# Altium PCB IoT_1062.PcbDoc (part 1 of 3)
Units mm, origin at the board's own origin, x right, y up, seen from the top; angles counter-clockwise.
Board outline 174.13 x 100.2 mm, 2 copper layers (Top Layer, Bottom Layer); 191 components, 138 nets, 1095 pads, 196 vias.
Unrouted connection lines stored in the file: 289.
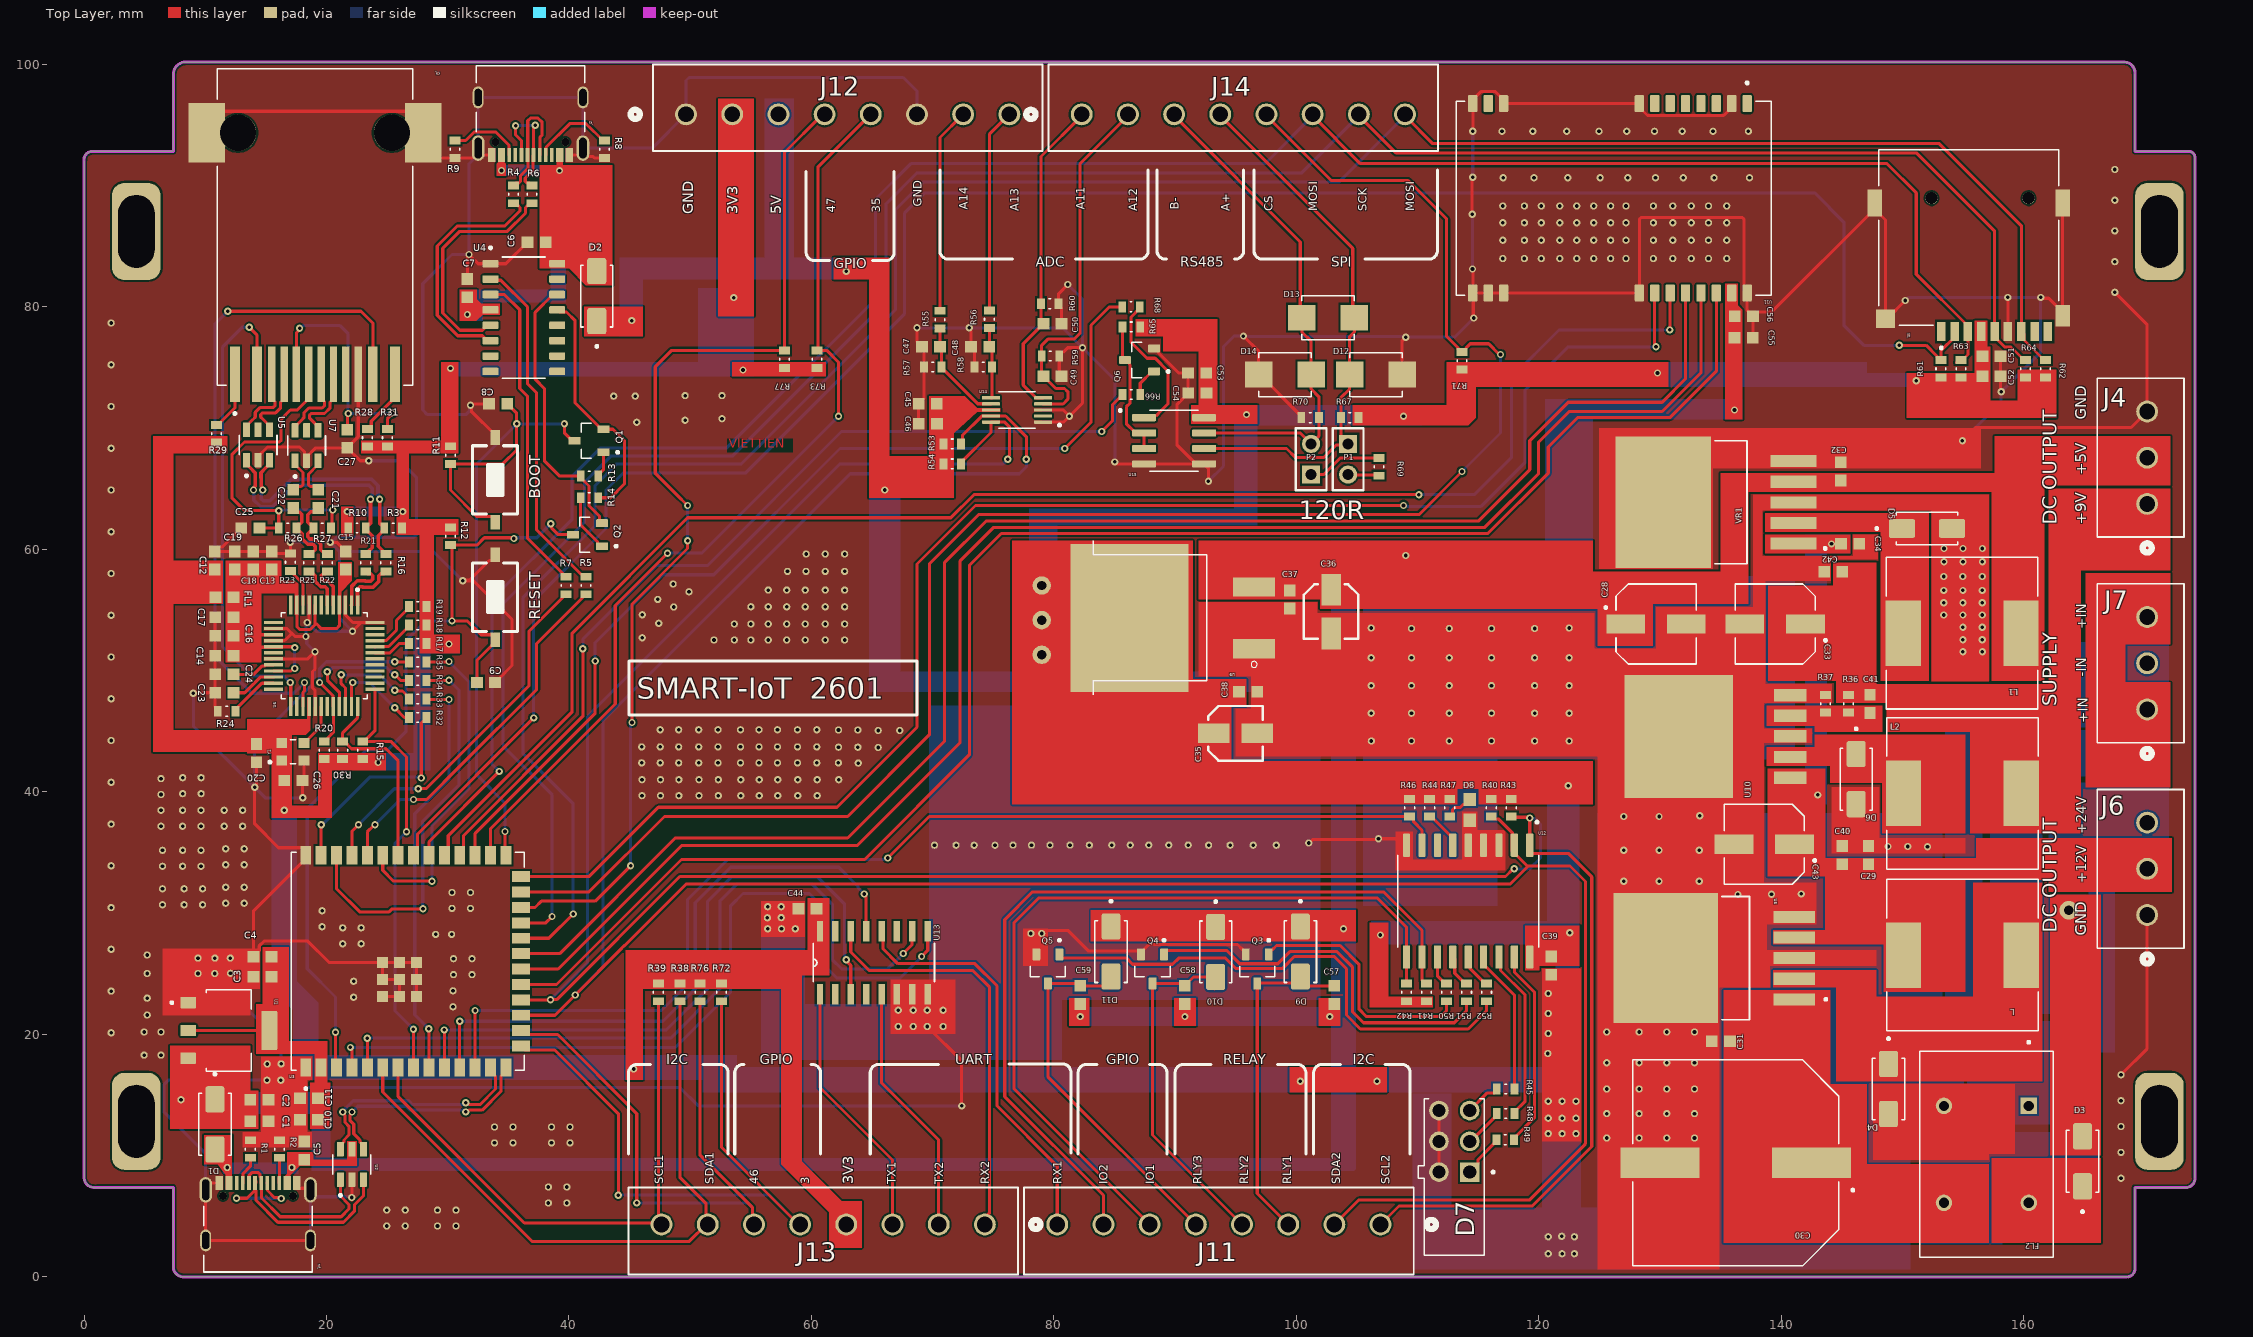
[diagram p0: Top Layer view]
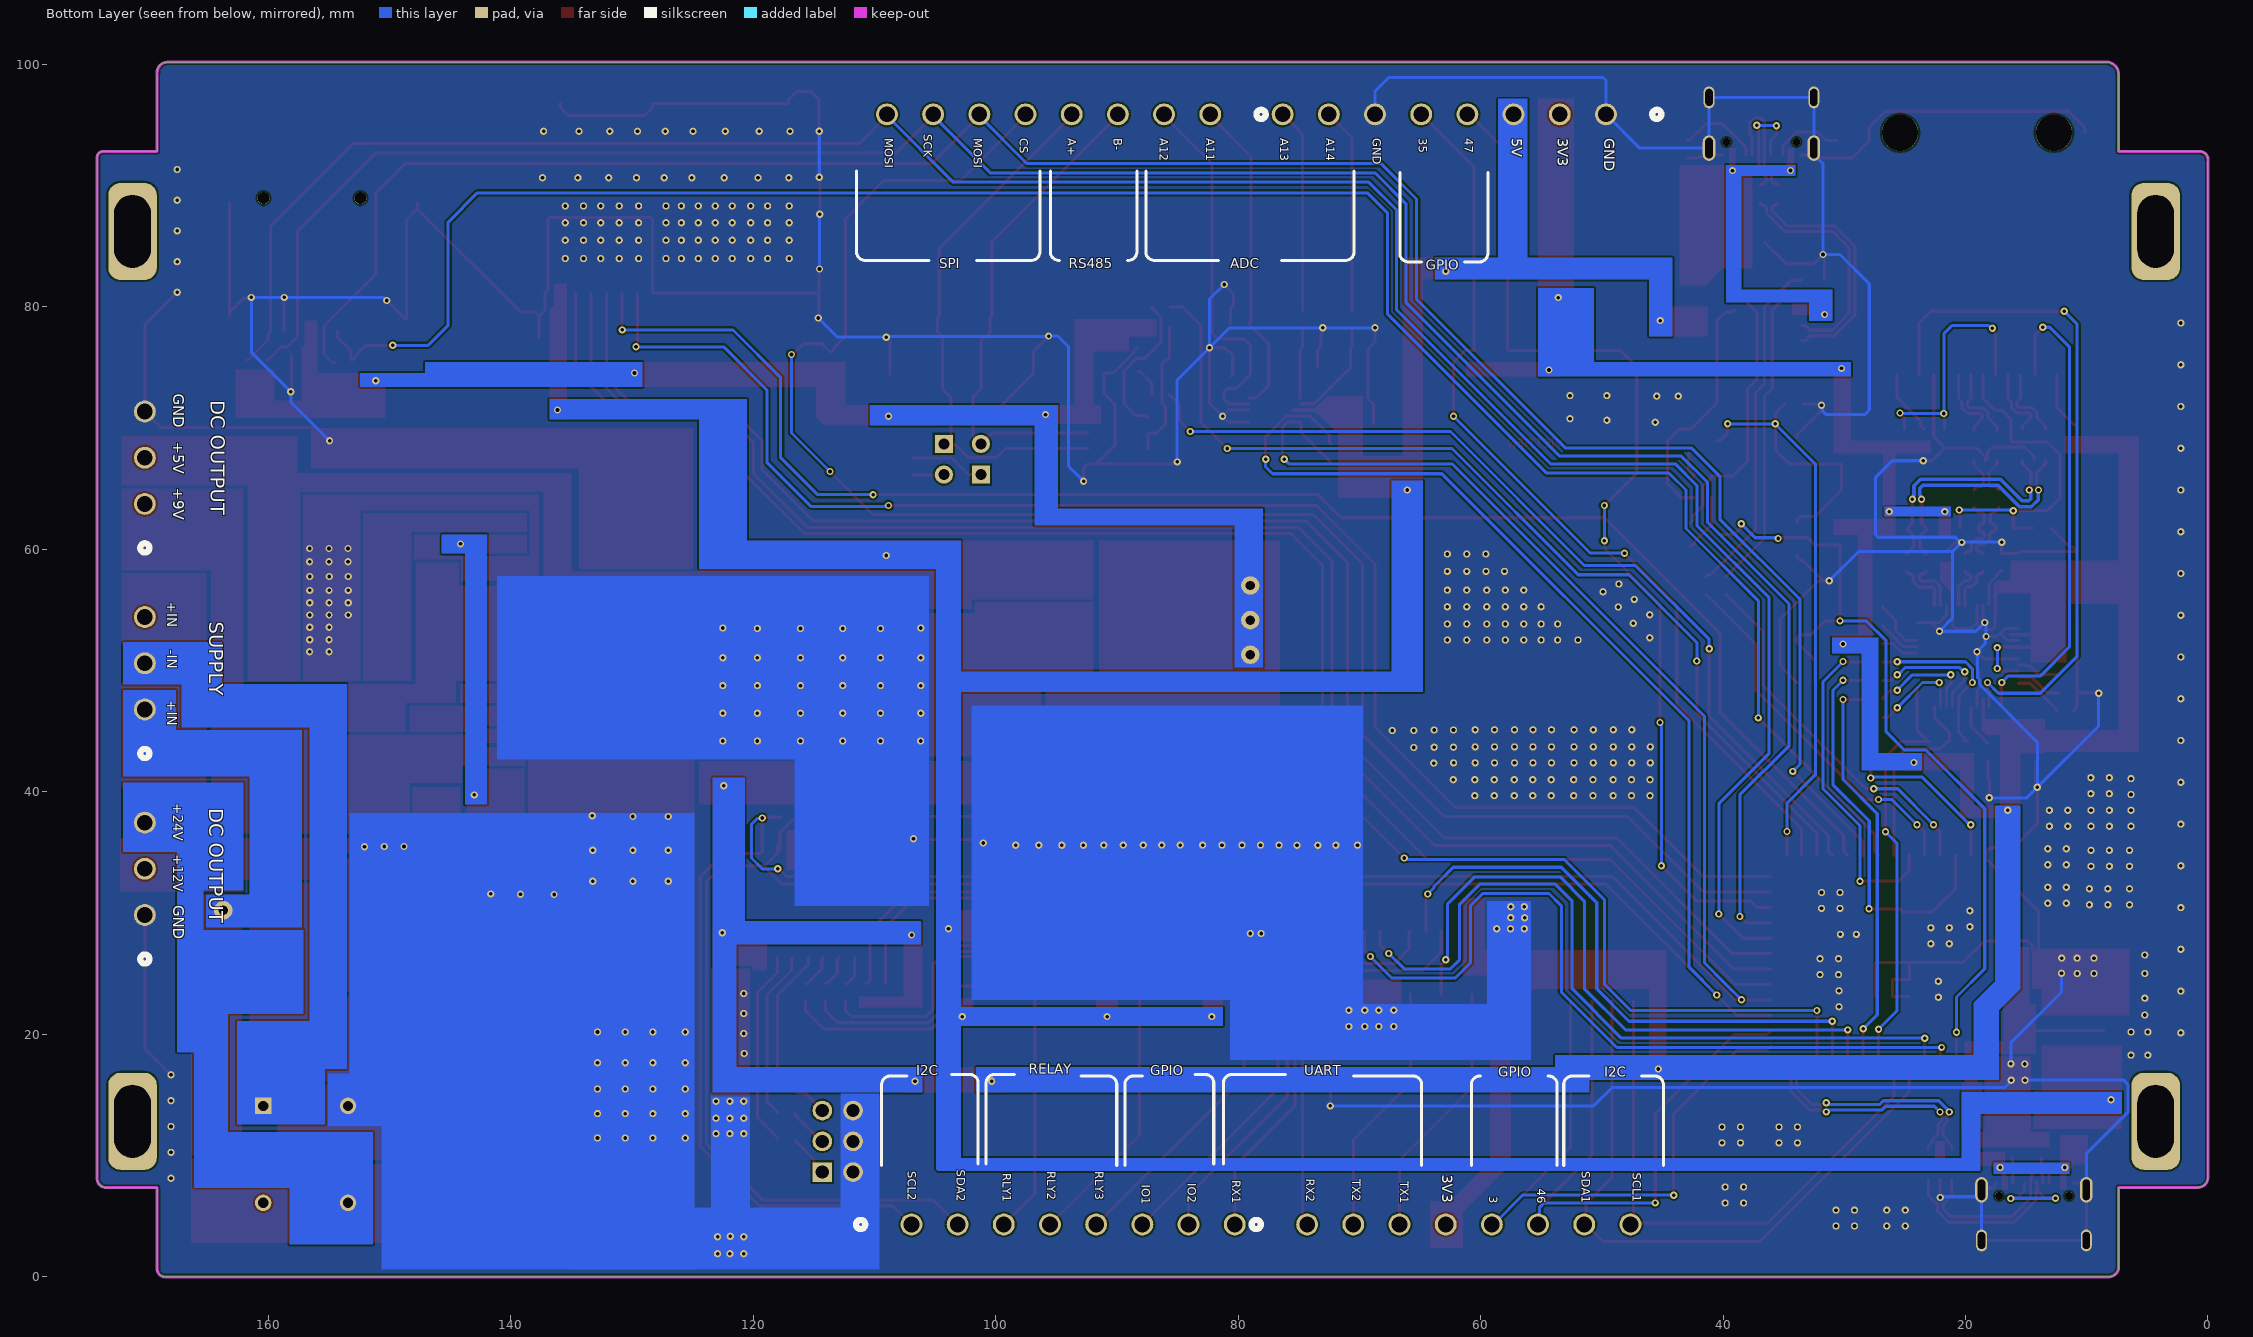
[diagram p1: Bottom Layer view, seen from below]
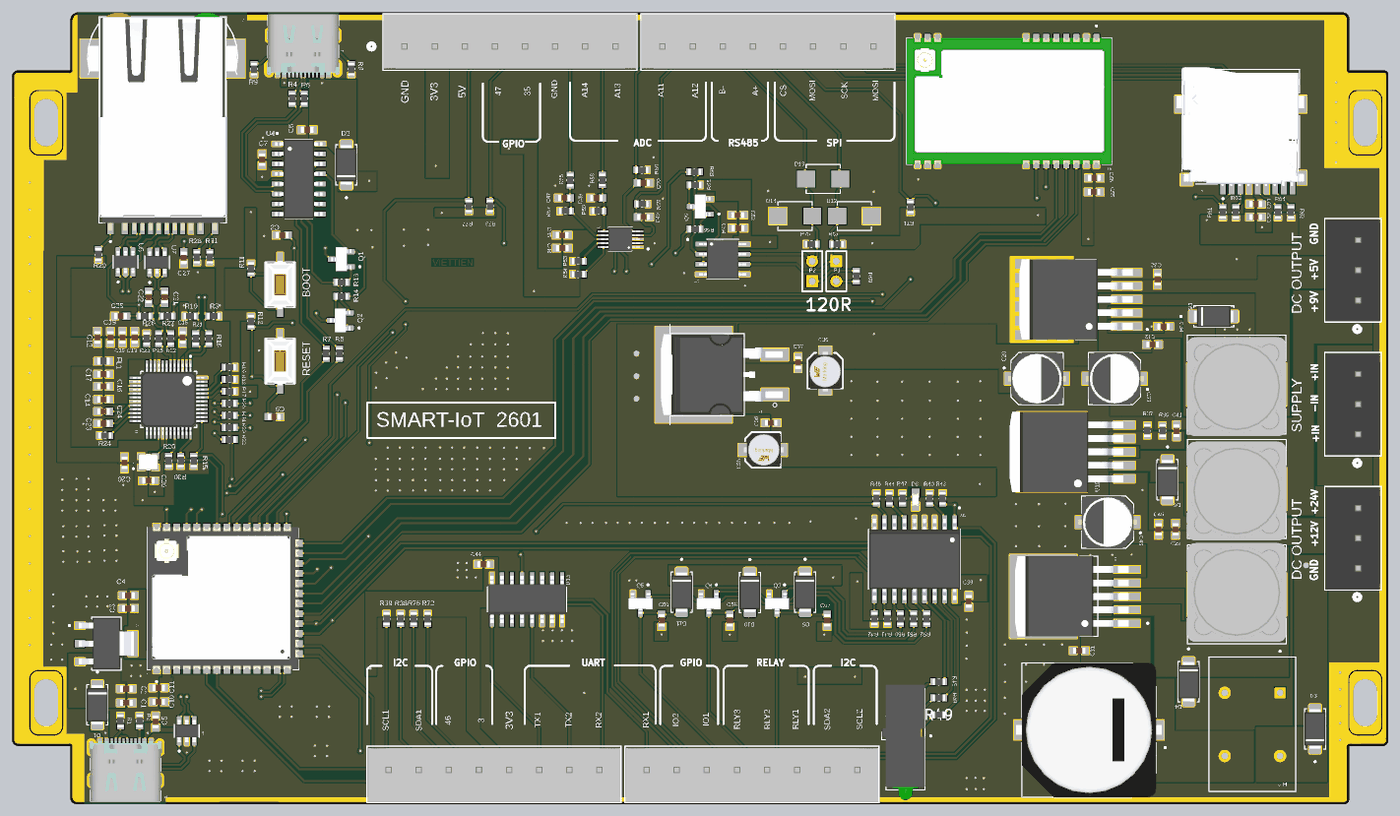
[diagram p4: 3D render of the assembled board from above, using the file's embedded part models]

## Layer stack, top to bottom
Top Solder: solder mask 0.0102, Solder Resist, Dk 3.5
Top Layer: signal copper 0.0356
Dielectric 1: dielectric 0.32, FR-4, Dk 4.8
Bottom Layer: signal copper 0.0356
Bottom Solder: solder mask 0.0102, Solder Resist, Dk 3.5

## Board outline
7.366,0.889 7.366,7.366 0.889,7.366 cw(c0.825,8.191) 0,8.128 0,92.075 cw(c0.699,92.138) 0.635,92.837 7.366,92.837 7.366,99.187 cw(c8.381,99.188) 8.38,100.203 168.367,100.203 cw(c168.284,99.314) 169.173,99.23 169.173,92.846 173.609,92.837 cw(c173.609,92.329) 174.117,92.329 174.117,8.255 cw(c173.355,8.128) 173.482,7.366 169.164,7.366 169.164,0.635 cw(c168.529,0.635) 168.529,0 8.128,0 cw(c8.191,0.825)

## Design rules (kind name [scope] priority, off if disabled: settings)
Clearance [All] p1: gap=0.15 ignorepadtopadclearanceinfootprint=FALSE
DiffPairsRouting [All] p1: maxlimit=0.5 minlimit=0.15 mostfreqgap=0.2 toplayer_minwidth=0.15 toplayer_maxwidth=0.387 toplayer_prefwidth=0.387 bottomlayer_minwidth=0.15 bottomlayer_maxwidth=0.387 bottomlayer_prefwidth=0.387 impedanceprofiledriven=TRUE impedanceprofileid={02A447C3-7AF3-4D12-9408-80F1CC7F62F1} impedanceprofilevalue=90.000000 maxuncoupledlength=12.7
HoleSize [All] p1: absolutevalues=TRUE maxlimit=10 minlimit=0.025 maxpercent=80.000 minpercent=20.000
MinimumSolderMaskSliver [All] p1: minsoldermaskwidth=0.002
PlaneConnect [All] p1: planeconnectstyle=Direct reliefexpansion=0.508 reliefentries=4 reliefconductorwidth=0.254 reliefairgap=0.254
PolygonConnect [All] p1: connectstyle=Direct reliefconductorwidth=0.254 reliefentries=4 polygonreliefangle="90 Angle" airgapwidth=0.254
RoutingVias [All] p1: holewidth=0.3 width=0.6 viastyle="Through Hole" minholewidth=0.3 minwidth=0.6 maxholewidth=2 maxwidth=3
SilkToSilkClearance [All] p1: silktosilkclearance=0.002
SilkToSolderMaskClearance [IsPad] p1: minsilkscreentomaskgap=0.002 clearancetoexposedcopper=TRUE
SolderMaskExpansion [All] p1: expansion=0.102 istentingtop=FALSE
Width [All] p1: maxlimit=0.254 minlimit=0.254 preferedwidth=0.254
24 further rules are at their usual default settings.

## Classes and differential pairs
component class Nguon: C28 C29 C30 C31 C32 C33 C34 C35 C36 C37 C38 C40 C41 C42 C43 D3 D4 D5 D6 FL2 J4 J6 J7 L L1 L2 R36 R37 U8 U9 U10 VR1
component class connection: C12 C13 C14 C15 C16 C17 C18 C19 C20 C21 C22 C23 C24 C25 C26 C27 C39 C44 C45 C46 C47 C48 C49 C50 C51 C52 C53 C54 C55 C56 C57 C58 C59 D7 D8 D9 D10 D11 D12 D13 D14 FL1 J3 J8 J11 J12 J13 J14 P1 P2 Q3 Q4 Q5 Q6 R3 R10 R15 R16 R17 R18 R19 R20 R21 R22 R23 R24 R25 R26 R27 R28 R29 R30 R31 R32 R33 R34 R35 R40 R41 R42 R43 R44 R45 R46 R47 R48 R49 R50 R51 R52 R53 R54 R55 R56 R57 R58 R59 R60 R61 R62 R63 R64 R65 R66 R67 R68 R69 R70 R71 R72 R73 R76 R77 U5 U6 U7 U11 U12 U13 U14 U15 Y1
component class vi_dieu_khien: BOOT C1 C2 C3 C4 C5 C6 C7 C8 C9 C10 C11 D1 D2 J1 J2 Q1 Q2 R1 R2 R4 R5 R6 R7 R8 R9 R11 R12 R13 R14 R38 R39 RESET U1 U2 U3 U4
differential pair W_TX: +W_TX_P -W_TX_N
differential pair W_RX: +W_RX_P -W_RX_N
differential pair TX: +TX_P -TX_N
differential pair RX: +RX_P -RX_N
differential pair RJ_TX: +RJ_TX_P -RJ_TX_N
differential pair RJ_RX: +RJ_RX_P -RJ_RX_N
differential pair ETH_RX: +ETH_RX_P -ETH_RX_N
differential pair USB: +USB_P -USB_N
differential pair USB1: +USB1_P -USB1_N
differential pair UD: +UD_P -UD_N
differential pair D: +D_P -D_N

## Components (designator, comment, footprint, x,y, rotation, side; value= is the part's Value field where it differs from the comment)
BOOT "Nut Nhan 2 Chan SMD 3x6x2.5" PCBComponent_1 35.687,61.666 r90 top
C1 "4.7uF" CAPC1608X94N 14.466,12.827 r180 top
C2 "0.1uF" CAPC1608X94N 14.466,14.605 r180 top
C3 "0.1uF" CAPC1608X94N 14.72,24.765 r0 top
C4 "4.7uF" CAPC1608X94N 14.72,26.416 r0 top
C5 "0.1uF" CAPC1608X94N 18.161,10.414 r270 top
C6 "0.1uF" CAPC1608X94N 37.338,85.344 r0 top
C7 "0.1uF" CAPC1608X94N 31.623,81.546 r270 top
C8 "0.1uF" CAPC1608X94N 34.163,72.009 r180 top
C9 "0.1uF" CAPC1608X94N 33.159,49.022 r0 top
C10 "0.1uF" CAPC1608X94N 18.554,12.954 r0 top
C11 "4.7uF" CAPC1608X94N 18.554,14.732 r0 top
C12 "100nF" CAPC1608X94N 10.795,59.084 r90 top
C13 "4.7uF" CAPC1608X94N 15.494,59.084 r90 top
C14 "100nF" CAPC1608X94N 11.569,51.222 r180 top
C15 "100nF" CAPC1608X94N 21.59,59.084 r90 top
C16 "100nF" CAPC1608X94N 11.569,52.873 r180 top
C17 "100nF" CAPC1608X94N 11.569,54.397 r180 top
C18 "100nF" CAPC1608X94N 13.97,59.084 r90 top
C19 "100nF" CAPC1608X94N 12.446,59.084 r90 top
C20 "100nF" CAPC1608X94N 14.224,43.198 r270 top
C21 "6.8nF" CAPC1608X94N 19.304,64.164 r90 top
C22 "6.8nF" CAPC1608X94N 17.272,64.164 r90 top
C23 "10nF" CAPC1608X94N 11.569,48.174 r180 top
C24 "4.7uF" CAPC1608X94N 11.569,49.698 r180 top
C25 "10nF" CAPC1608X94N 13.728,61.763 r0 top
C26 "100nF" CAPC1608X94N 17.26,40.935 r0 top
C27 "22nF" CAPC1608X94N 21.717,69.129 r90 top
C28 "100uF/35V" CAP_EEEFTE221XAL 129.667,53.848 r0 top
C29 "0.1uF" CAPC1608X94N 147.193,34.786 r270 top
C30 "1000uF/50V" CAP_EEVFK1H102M 136.244,9.398 r180 top
C31 "0.1uF" CAPC1608X94N 135.013,19.431 r0 top
C32 "0.1uF" CAPC1608X94N 144.907,66.433 r270 top
C33 "100uF/35V" CAP_EEEFTE221XAL 139.486,53.848 r180 top
C34 "0.1uF" CAPC1608X94N 145.681,60.452 r180 top
C35 "10uF/16V" WCAP-ASNP_4X5.5(DXL) 94.974,44.831 r180 top
C36 "10uF/16V" WCAP-AS5H_4X5.5(DXL) 102.87,54.864 r90 top
C37 "0.1uF" CAPC1608X94N 99.441,55.868 r90 top
C38 "0.1uF" CAPC1608X94N 96.024,48.26 r180 top
C39 "0.1uF" CAPC1608X94N 121.031,25.666 r90 top
C40 "0.1uF" CAPC1608X94N 145.034,34.786 r270 top
C41 "82pF" CAPC1608X94N 147.32,47.256 r90 top
C42 "0.1uF" CAPC1608X94N 144.284,58.166 r0 top
C43 "100uF/35V" CAP_EEEFTE221XAL 138.597,35.687 r180 top
C44 "0.1uF" CAPC1608X94N 59.678,30.353 r0 top
C45 "10uF" CAPC1608X94N 69.596,72.009 r0 top
C46 "0.1uF" CAPC1608X94N 69.608,70.358 r0 top
C47 "10uF" CAPC1608X94N 69.862,76.708 r0 top
C48 "10uF" CAPC1608X94N 73.914,76.708 r0 top
C49 "10uF" CAPC1608X94N 79.883,74.295 r180 top
C50 "10uF" CAPC1608X94N 79.883,78.613 r180 top
C51 "10uF" CAPC1608X94N 157.341,75.946 r180 top
C52 "100nF" CAPC1608X94N 157.341,74.295 r180 top
C53 "0.1uF" CAPC1608X94N 91.821,74.549 r0 top
C54 "10uF" CAPC1608X94N 91.833,72.898 r0 top
C55 "0.1uF" CAPC1608X94N 136.894,77.47 r180 top
C56 "4.7uF" CAPC1608X94N 136.918,79.248 r180 top
C57 "0.1uF" CAPC1608X94N 103.124,23.253 r270 top
C58 "0.1uF" CAPC1608X94N 90.805,23.253 r270 top
C59 "0.1uF" CAPC1608X94N 82.169,23.253 r270 top
D1 "B340A-E3/61T" DIOM5126X229N 10.795,12.573 r270 top
D2 "B340A-E3/61T" DIOM5126X229N 42.291,80.899 r90 top
D3 "B340A-E3/61T" DIOM5126X229N 164.846,9.525 r90 top
D4 "B340A-E3/61T" DIOM5126X229N 148.844,15.494 r270 top
D5 "B340A-E3/61T" DIOM5126X229N 152.019,61.722 r0 top
D6 "B340A-E3/61T" DIOM5126X229N 146.177,41.054 r270 top
D7 "5700100132F" LED_5700100132F 113.03,8.636 r90 top
D8 "LTST-C191KSKT" 0603 114.3,38.52 r90 top
D9 "B340A-E3/61T" DIOM5126X229N 100.33,26.83 r270 top
D10 "B340A-E3/61T" DIOM5126X229N 93.345,26.797 r270 top
D11 "B340A-E3/61T" DIOM5126X229N 84.709,26.83 r270 top
D12 "SMBJ12CA" DIOM4336X265N 106.559,74.422 r0 top
D13 "SMBJ12CA" DIOM4336X265N 102.616,79.121 r0 top
D14 "SMBJ12CA" DIOM4336X265N 99.054,74.422 r0 top
FL1 "120R" BEADC1608X95N 11.584,56.048 r0 top
FL2 "FIL_SU9V-07010" FIL_SU9V-07010 156.916,10.097 r270 top
J1 "TypeC_12pin_12402012E212A" TypeC_12pin_12402012E212A 14.355,2.997 r0 top
J2 "TypeC_12pin_12402012E212A" TypeC_12pin_12402012E212A 36.83,97.282 r180 top
J3 "Ethernet_HR961160C" HANRUN_HR961160C 19.05,86.591 r0 top
J4 "395111003" CONN_SD-39511-001_03P_MOL 170.18,63.754 r90 top
J6 "395111003" CONN_SD-39511-001_03P_MOL 170.18,29.845 r90 top
J7 "395111003" CONN_SD-39511-001_03P_MOL 170.18,46.799 r90 top
J8 "MSD-1-A" CUI_MSD-1-A 155.448,85.725 r180 top
J11 "395111008" terminal_block_8_male 106.947,4.318 r180 top
J12 "395111008" terminal_block_8_male 49.657,95.885 r0 top
J13 "395111008" terminal_block_8_male 74.308,4.318 r180 top
J14 "395111008" terminal_block_8_male 82.296,95.885 r0 top
L "47uH" Introdutor_47uH_12x12x7 154.94,26.543 r0 top
L1 "47uH" Introdutor_47uH_12x12x7 154.916,53.086 r180 top
L2 "47uH" Introdutor_47uH_12x12x7 154.94,39.878 r180 top
P1 "Header 2" HDR1X2 104.267,68.707 r270 top
P2 "Header 2" HDR1X2 101.219,66.167 r90 top
Q1 "MMBT3904" TRANS_MMBT3904 41.656,68.961 r180 top
Q2 "MMBT3904" TRANS_MMBT3904 41.529,61.214 r180 top
Q3 "MMBT3904" TRANS_MMBT3904 96.774,25.4 r270 top
Q4 "MMBT3904" TRANS_MMBT3904 88.138,25.4 r270 top
Q5 "MMBT3904" TRANS_MMBT3904 79.502,25.4 r270 top
Q6 "MMBT3904" TRANS_MMBT3904 87.065,75.626 r180 top
R1 "5K1" RES_ERJU03J474V 13.716,10.541 r270 top
R2 "5K1" RES_ERJU03J474V 16.129,10.541 r270 top
R3 "49R9" RES_ERJU03J474V 25.49,61.763 r0 top
R4 "22R" RES_ERJU03J474V 35.433,89.281 r270 top
R5 "22R" RES_ERJU03J474V 41.402,57.023 r270 top
R6 "22R" RES_ERJU03J474V 36.957,89.281 r270 top
R7 "22R" RES_ERJU03J474V 39.751,57.023 r270 top
R8 "5K1" RES_ERJU03J474V 42.926,93.009 r90 top
R9 "5K1" RES_ERJU03J474V 30.607,93.009 r90 top
R10 "49R9" RES_ERJU03J474V 22.516,61.763 r180 top
R11 "10k" RES_ERJU03J474V 30.226,67.781 r270 top
R12 "10k" RES_ERJU03J474V 30.226,61.087 r270 top
R13 "1K" RES_ERJU03J474V 41.693,66.04 r180 top
R14 "1k" RES_ERJU03J474V 41.693,64.262 r0 top
R15 "4k7" RES_ERJU03J474V 22.987,43.438 r90 top
R16 "22R" RES_ERJU03J474V 24.892,58.899 r90 top
R17 "4k7" RES_ERJU03J474V 27.522,52.238 r180 top
R18 "4k7" RES_ERJU03J474V 27.522,53.762 r180 top
R19 "4k7" RES_ERJU03J474V 27.522,55.286 r180 top
R20 "4k7" RES_ERJU03J474V 19.812,43.438 r90 top
R21 "22R" RES_ERJU03J474V 23.241,58.899 r90 top
R22 "22R" RES_ERJU03J474V 20.066,58.899 r90 top
R23 "12k4" RES_ERJU03J474V 17.018,58.932 r90 top
R24 "4k7" RES_ERJU03J474V 11.754,46.65 r180 top
R25 "22R" RES_ERJU03J474V 18.542,58.899 r90 top
R26 "49R9" RES_ERJU03J474V 16.788,61.763 r0 top
R27 "49R9" RES_ERJU03J474V 19.648,61.763 r180 top
R28 "470R" RES_ERJU03J474V 23.368,69.219 r270 top
R29 "470R" RES_ERJU03J474V 10.922,69.547 r270 top
R30 "10R" RES_ERJU03J474V 21.336,43.438 r270 top
R31 "10R" RES_ERJU03J474V 25.019,69.219 r270 top
R32 "22R" RES_ERJU03J474V 27.522,46.142 r180 top
R33 "22R" RES_ERJU03J474V 27.522,47.666 r180 top
R34 "22R" RES_ERJU03J474V 27.522,49.19 r180 top
R35 "22R" RES_ERJU03J474V 27.522,50.714 r180 top
R36 "6k3" RES_ERJU03J474V 145.542,47.281 r90 top
R37 "1k" RES_ERJU03J474V 143.637,47.281 r270 top
R38 "10K" RES_ERJU03J474V 49.149,23.458 r90 top
R39 "10K" RES_ERJU03J474V 47.371,23.458 r90 top
R40 "10K" RES_ERJU03J474V 116.078,38.698 r90 top
R41 "10K" RES_ERJU03J474V 110.744,23.458 r270 top
R42 "10K" RES_ERJU03J474V 109.093,23.458 r270 top
R43 "10K" RES_ERJU03J474V 117.729,38.698 r90 top
R44 "10K" RES_ERJU03J474V 110.998,38.698 r90 top
R45 "10k" RES_ERJU03J474V 117.258,15.494 r0 top
R46 "10k" RES_ERJU03J474V 109.347,38.698 r90 top
R47 "10k" RES_ERJU03J474V 112.649,38.698 r90 top
R48 "10k" RES_ERJU03J474V 117.258,13.462 r0 top
R49 "10k" RES_ERJU03J474V 117.221,11.303 r0 top
R50 "10k" RES_ERJU03J474V 112.395,23.458 r270 top
R51 "10k" RES_ERJU03J474V 114.046,23.458 r270 top
R52 "10k" RES_ERJU03J474V 115.697,23.458 r270 top
R53 "4K7" RES_ERJU03J474V 71.628,68.707 r180 top
R54 "4K7" RES_ERJU03J474V 71.628,67.056 r180 top
R55 "10K" RES_ERJU03J474V 70.612,78.957 r270 top
R56 "10K" RES_ERJU03J474V 74.676,78.994 r270 top
R57 "10K" RES_ERJU03J474V 70.014,75.057 r180 top
R58 "10K" RES_ERJU03J474V 74.168,75.057 r180 top
R59 "150R" RES_ERJU03J474V 79.719,75.946 r0 top
R60 "150R" RES_ERJU03J474V 79.666,80.264 r0 top
R61 "10K" RES_ERJU03J474V 153.162,74.893 r90 top
R62 "10K" RES_ERJU03J474V 161.798,74.893 r90 top
R63 "10K" RES_ERJU03J474V 154.813,74.893 r90 top
R64 "10K" RES_ERJU03J474V 160.147,74.893 r90 top
R65 "10K" RES_ERJU03J474V 86.397,78.359 r180 top
R66 "10k" RES_ERJU03J474V 86.397,72.771 r180 top
R67 "4K7" RES_ERJU03J474V 104.394,70.866 r0 top
R68 "10k" RES_ERJU03J474V 86.36,80.01 r180 top
R69 "120R" RES_ERJU03J474V 106.807,66.802 r270 top
R70 "4K7" RES_ERJU03J474V 101.129,70.866 r0 top
R71 "10K" RES_ERJU03J474V 113.665,75.565 r90 top
R72 "10K" RES_ERJU03J474V 52.578,23.458 r270 top
R73 "10K" RES_ERJU03J474V 60.452,75.692 r90 top
R76 "10K" RES_ERJU03J474V 50.8,23.458 r270 top
R77 "10K" RES_ERJU03J474V 57.785,75.692 r90 top
RESET "Nut Nhan 2 Chan SMD 3x6x2.5" PCBComponent_1 35.687,51.999 r90 top
U1 "AMS1117" SOT229P700X180-4N 11.938,20.32 r0 top
U2 "USBLC6-2SC6" USBLC6-2SC6 22.098,9.271 r90 top
U3 "ESP32-S3-WROOM-1U-N4R2" XCVR_ESP32-S3-WROOM-1U-N4R2 26.698,26.022 r90 top
U4 "CH340C" CH340C 36.278,79.121 r0 top
U5 "USBLC6-2SC6" USBLC6-2SC6 14.351,68.621 r90 top
U6 "W5500" QFP50P900X900X160-48N 19.812,51.222 r270 top
U7 "USBLC6-2SC6" USBLC6-2SC6 18.354,68.565 r90 top
U8 "LM2596S-12/NOPB" VREG_LM2596S-12/NOPB 130.471,26.289 r180 top
U9 "LD1085D2T33R" LD1085D2T33R 89.808,54.356 r180 top
U10 "LM2596S-ADJ" LM2596S-ADJ 131.689,44.577 r90 top
U11 "E32-433T20S" MODULE_E32-433T20S 126.184,88.964 r270 top
U12 "MCP23008-E/SO" SOIC127P1030X265-18N 114.173,30.988 r270 top
U13 "74HC4052D" SOIC127P600X175-16N 65.151,25.908 r90 top
U14 "ADS1015IDGSR" SOP50P490X110-10N 76.962,71.501 r180 top
U15 "MAX3485ESA+" SOIC127P600X175-8N 89.916,68.961 r0 top
VR1 "LM2596S-5.0" LM2596S-5.0 134.62,63.881 r180 top
Y1 "CRY_ECS-2520MV-250-BN-TR" OSC_ECS-2520S25-250-FN-TR 17.236,43.308 r0 top

## Footprints (in the part's own frame and the unit in brackets; to place one, negate y for a bottom-side part, rotate by r counter-clockwise, add the part's x,y. Pads: shape width x height; smd on the part's side, far side on the other; paste and mask are expansions set on the pad)
0603 [mm]
  rect 1.1x1 smd: 1(-0.85,0) 2(0.85,0)
  body extent -0.8,-0.4 0.8,0.4, height 0.55
BEADC1608X95N [mm]
  rect 1x0.97 smd: 1(-0.735,0) 2(0.735,0)
  body extent -0.8,-0.44 0.8,0.51, height 0.78
CAP_EEEFTE221XAL [mm]
  rect 3.2x1.6 smd: 1(-2.5,0) 2(2.5,0)
  silkscreen extent -4.25,-3.3 3.3,3.3, body extent -3.65,-3.3 3.65,3.3, height 7.7
CAP_EEVFK1H102M [mm]
  rect 6.5x2.5 smd: 1(-6.25,0) 2(6.25,0)
  silkscreen extent -9.75,-8.5 8.5,8.5, body extent -9.2,-8.5 9.2,8.5, height 16.5
CAPC1608X94N [mm]
  rect 0.97x0.94 smd paste+0 mask+0.102: 1(-0.75,0) 2(0.75,0)
  body extent -0.8,-0.4 0.8,0.4, height 0.94
CH340C [mm]
  rrect25% 1.31x0.62 smd: 1(-2.75,4.445) 2(-2.75,3.175) 3(-2.75,1.905) 4(-2.75,0.635) 5(-2.75,-0.635) 6(-2.75,-1.905) 7(-2.75,-3.175) 8(-2.75,-4.445) 9(2.75,-4.445) 10(2.75,-3.175) 11(2.75,-1.905) 12(2.75,-0.635) 13(2.75,0.635) 14(2.75,1.905) 15(2.75,3.175) 16(2.75,4.445)
  silkscreen extent -2.85,-5 1.78,5.85, body extent -3,-5 3,5, height 1.8
CONN_SD-39511-001_03P_MOL [mil]
  round 71 hole 51 mask+4.02: 1(0,0) 2(150,0) 3(300,0)
  silkscreen extent -158,-120 408,162, body extent -102,-115 402,155, height 360
CUI_MSD-1-A [mm]
  rect 0.7x1.6 smd: 1(2.25,7.75) 2(1.15,7.75) 3(0.05,7.75) 4(-1.05,7.75) 5(-2.15,7.75) 6(-3.25,7.75) 7(-4.35,7.75) 8(-5.45,7.75) CD(-6.55,7.75)
  rect 1.2x1.8 smd: G1(-7.75,6.45)
  rect 1.6x1.5 smd: G2(6.85,6.7)
  rect 1.2x2.2 smd: G3(-7.75,-2.85) G4(7.75,-2.85)
  round 1 hole 1 unplated: ""(-4.95,-3.25) ""(3.05,-3.25)
  silkscreen extent -7.42,-7.25 7.42,9.2, body extent -8.02,-7.52 8.13,7.52, height 1.8
DIOM4336X265N [mm]
  rect 2.28x2.12 smd: 1(-2.165,0) 2(2.165,0)
  silkscreen extent -2.16,-1.81 2.16,1.81
DIOM5126X229N [mm]
  rrect25% 2.17x1.57 smd: A(2.065,0) C(-2.065,0)
  silkscreen extent -4.25,-1.33 2.55,1.33, body extent -2.55,-1.33 2.55,1.33, height 2.29
FIL_SU9V-07010 [mm]
  rect 1.358x1.358 / inner round 1.358 / far side rect 1.358x1.358 hole 0.85: 1(-4,3.5)
  round 1.358 hole 0.85: 2(-4,-3.5) 3(4,-3.5) 4(4,3.5)
  silkscreen extent -9.35,-5.5 8.5,5.5
HANRUN_HR961160C [mm]
  rect 0.81x4.6 smd: P1(-6.61,-12.15) P2(-4.77,-12.15) P11(4.77,-12.15) P12(6.61,-12.15)
  rect 0.61x4.6 smd: P3(-3.57,-12.15) P4(-2.55,-12.15) P5(-1.53,-12.15) P6(-0.51,-12.15) P7(0.51,-12.15) P8(1.53,-12.15) P9(2.55,-12.15) P10(3.57,-12.15)
  rect 3x4.9 smd: SH1(-8.92,7.77) SH2(8.92,7.77)
  round 3 hole 3 unplated: ""(-6.35,7.77) ""(6.35,7.77)
  silkscreen extent -8.05,-15.49 8.05,13.05, body extent -9.57,-13.96 9.57,13.57, height 15.33
HDR1X2 [mm] "Connector; Header; 2 Position"
  rect 1.5x1.5 hole 0.9: 1(0,0)
  round 1.5 hole 0.9: 2(2.54,0)
  silkscreen extent -1.27,-1.27 3.81,1.27
Introdutor_47uH_12x12x7 [mm]
  rect 2.9x5.4 smd: 1(-4.85,0) 2(4.85,0)
  silkscreen extent -6.25,-6.25 6.25,6.25, body extent -6.25,-6 6.25,6.5, height 6
LD1085D2T33R [mm]
  rect 3.5x1.6 smd: 1(-6.7,2.54) 2(-6.7,-2.54)
  rect 9.75x12.2 smd: 3(3.575,0)
  silkscreen extent -6.95,-6.35 6.55,6.35, body extent -7.71,-5.1 7.71,5.1, height 4.6
LED_5700100132F [mm]
  rect 1.62x1.62 / inner round 1.62 / far side rect 1.62x1.62 hole 1.08: 1(0,-1.27)
  round 1.62 hole 1.08: 2(0,1.27) 3(2.54,-1.27) 4(2.54,1.27) 5(5.08,-1.27) 6(5.08,1.27)
  silkscreen extent -6.85,-3.3 6.04,2.99, body extent -8.18,-2.49 6.45,3, height 10.41
LM2596S-5.0 [mm]
  rect 3.79x0.99 smd: 1(-6.4,3.4) 2(-6.4,1.7) 3(-6.4,0) 4(-6.4,-1.7) 5(-6.4,-3.4)
  rect 7.88x10.84 smd paste-6: 6(4.35,0)
  silkscreen extent -9.1,-5.08 0.09,5.08, body extent -7.18,-5.08 7.18,5.08, height 4.65
LM2596S-ADJ [mil]
  rect 40x106 smd: 1(-134,-356) 2(-67,-356) 3(0,-356) 4(67,-356) 5(134,-356)
  rect 400x352 smd: 6(0,6)
  body extent -200,-350 200,215, height 185
MODULE_E32-433T20S [mm]
  rrect25% 1.41x0.77 smd: 1(-7.81,11) 2(-7.81,9.73) 3(-7.81,8.46) 4(-7.81,7.19) 5(-7.81,5.92) 6(-7.81,4.65) 7(-7.81,3.38) 8(-7.81,2.11) 11(-7.81,-9.09) 12(-7.81,-10.36) 13(-7.81,-11.63) 14(7.81,-11.63) 15(7.81,-10.36) 16(7.81,-9.09) 19(7.81,2.11) 20(7.81,3.38) 21(7.81,4.65) 22(7.81,5.92) 23(7.81,7.19) 24(7.81,8.46) 25(7.81,9.73) 26(7.81,11)
  silkscreen extent -9.61,-13 8,13, body extent -8,-13 8,13, height 3.25
OSC_ECS-2520S25-250-FN-TR [mm]
  rect 0.9x0.8 smd: 1(-0.925,-0.725) 2(0.925,-0.725) 3(0.925,0.725) 4(-0.925,0.725)
  silkscreen extent -2,-1 0.22,1, body extent -1.25,-1 1.25,1, height 0.9
PCBComponent_1 [mm]
  rect 1.2x0.8 smd: 1(0.564,1.778) 2(7.564,1.778)
  silkscreen extent 1.24,-0.08 6.88,3.63, body extent 1.01,-0.07 7.11,3.63, height 2.5
QFP50P900X900X160-48N [mm]
  rect 1.56x0.28 smd: 1(-4.18,2.75) 2(-4.18,2.25) 3(-4.18,1.75) 4(-4.18,1.25) 5(-4.18,0.75) 6(-4.18,0.25) 7(-4.18,-0.25) 8(-4.18,-0.75) 9(-4.18,-1.25) 10(-4.18,-1.75) 11(-4.18,-2.25) 12(-4.18,-2.75) 25(4.18,-2.75) 26(4.18,-2.25) 27(4.18,-1.75) 28(4.18,-1.25) 29(4.18,-0.75) 30(4.18,-0.25) 31(4.18,0.25) 32(4.18,0.75) 33(4.18,1.25) 34(4.18,1.75) 35(4.18,2.25) 36(4.18,2.75)
  rect 0.28x1.56 smd: 13(-2.75,-4.18) 14(-2.25,-4.18) 15(-1.75,-4.18) 16(-1.25,-4.18) 17(-0.75,-4.18) 18(-0.25,-4.18) 19(0.25,-4.18) 20(0.75,-4.18) 21(1.25,-4.18) 22(1.75,-4.18) 23(2.25,-4.18) 24(2.75,-4.18) 37(2.75,4.18) 38(2.25,4.18) 39(1.75,4.18) 40(1.25,4.18) 41(0.75,4.18) 42(0.25,4.18) 43(-0.25,4.18) 44(-0.75,4.18) 45(-1.25,4.18) 46(-1.75,4.18) 47(-2.25,4.18) 48(-2.75,4.18)
  silkscreen extent -5.55,-3.55 3.55,3.55, body extent -4.5,-4.5 4.5,4.5, height 1.6
RES_ERJU03J474V [mm]
  rect 0.65x0.9 smd: 1(-0.725,0) 2(0.725,0)
  silkscreen extent -0.08,-0.4 0.08,0.4, body extent -0.8,-0.4 0.8,0.4, height 0.45
SOIC127P600X175-8N [mm]
  rrect25% 1.97x0.59 smd paste+0 mask+0.102: 1(-2.475,1.905) 2(-2.475,0.635) 3(-2.475,-0.635) 4(-2.475,-1.905) 5(2.475,-1.905) 6(2.475,-0.635) 7(2.475,0.635) 8(2.475,1.905)
  silkscreen extent -4.54,-2.52 2,2.59, body extent -3,-2.49 3,2.49, height 1.68
SOIC127P600X175-16N [mil]
  rect 67x21 smd: 1(-102,175) 2(-102,125) 3(-102,75) 4(-102,25) 5(-102,-25) 6(-102,-75) 7(-102,-125) 8(-102,-175) 9(102,-175) 10(102,-125) 11(102,-75) 12(102,-25) 13(102,25) 14(102,75) 15(102,125) 16(102,175)
  silkscreen extent -62,-197 62,197, body extent -118,-195 118,195, height 69
SOIC127P1030X265-18N [mm]
  rrect25% 1.91x0.6 smd: 1(-4.61,5.08) 2(-4.61,3.81) 3(-4.61,2.54) 4(-4.61,1.27) 5(-4.61,0) 6(-4.61,-1.27) 7(-4.61,-2.54) 8(-4.61,-3.81) 9(-4.61,-5.08) 10(4.61,-5.08) 11(4.61,-3.81) 12(4.61,-2.54) 13(4.61,-1.27) 14(4.61,0) 15(4.61,1.27) 16(4.61,2.54) 17(4.61,3.81) 18(4.61,5.08)
  silkscreen extent -6.62,-5.82 3.8,5.82, body extent -5.15,-5.77 5.15,5.77, height 2.65
SOP50P490X110-10N [mm]
  rrect25% 1.47x0.28 smd: 1(-2.15,1) 2(-2.15,0.5) 3(-2.15,0) 4(-2.15,-0.5) 5(-2.15,-1) 6(2.15,-1) 7(2.15,-0.5) 8(2.15,0) 9(2.15,0.5) 10(2.15,1)
  silkscreen extent -3.6,-1.5 1.5,1.5, body extent -2.45,-1.5 2.45,1.5, height 1.1
SOT229P700X180-4N [mm]
  rrect15% 1.31x0.93 smd: 1(-3.345,2.29) 2(-3.345,0) 3(-3.345,-2.29)
  rrect15% 1.31x3.24 smd: 2(3.345,0)
  silkscreen extent -4.8,-3.36 1.86,3.36, body extent -3.5,-3.25 3.5,3.25, height 1.8
terminal_block_8_male [mil]
  round 71 / inner round 60 / far side round 71 hole 51 paste-35.5 mask+0: 1(0,0) 2(150,0) 3(300,0) 4(450,0) 5(600,0) 6(750,0) 7(900,0) 8(1050,0)
  silkscreen extent -180,-120 1158,162, body extent -103,-110 1152,160, height 360
TRANS_MMBT3904 [mm]
  rrect25% 1x0.65 smd paste+0 mask+0.102: 1(-1.2,0.95) 2(-1.2,-0.95) 3(1.2,0)
  silkscreen extent -2.46,-1.45 0.65,1.45, body extent -1.3,-1.52 1.3,1.52, height 1.3
TypeC_12pin_12402012E212A [mm]
  rect 0.6x1.14 smd: A1_B12(-3.2,4.75) A4_B9(-2.4,4.75) B1_A12(3.2,4.75) B4_A9(2.4,4.75)
  rect 0.3x1.14 smd: A5(-1.25,4.75) A6(-0.25,4.75) A7(0.25,4.75) A8(1.25,4.75) B5(1.75,4.75) B6(0.75,4.75) B7(-0.75,4.75) B8(-1.75,4.75)
  oval 1.05x2.1 hole 0.6 slot 1.7 at 90 deg: SH1(-4.32,4.18) SH2(4.32,4.18)
  oval 0.9x1.8 hole 0.6 slot 1.4 at 90 deg: SH3(-4.32,0) SH4(4.32,0)
  round 0.65 hole 0.65 unplated: ""(-2.89,3.68) ""(2.89,3.68)
  silkscreen extent -4.47,-2.6 4.47,2.81, body extent -4.47,-2.65 4.47,4.95, height 3.15
USBLC6-2SC6 [mm]
  rrect25% 1.21x0.59 smd: 1(-1.255,0.95) 2(-1.255,0) 3(-1.255,-0.95) 4(1.255,-0.95) 5(1.255,0) 6(1.255,0.95)
  silkscreen extent -2.65,-1.57 0.81,1.57, body extent -1.4,-1.46 1.4,1.46, height 1.44
VREG_LM2596S-12/NOPB [mm]
  rect 3.4x1 smd paste-0.05 mask+0.07: 1(-10.6,3.4) 2(-10.6,1.7) 3(-10.6,0) 4(-10.6,-1.7) 5(-10.6,-3.4)
  rect 8.6x10.7 smd paste-0.05 mask+0.07: 6(0,0)
  silkscreen extent -13.3,-5.08 -4.62,5.08, body extent -10.79,-5.08 3.56,5.08, height 4.65
WCAP-AS5H_4X5.5(DXL) [mm]
  rect 2.6x1.6 smd paste+0 mask+0.102: 1(1.8,0) 2(-1.8,0)
  silkscreen extent -2.25,-2.25 2.25,2.25, body extent -2.63,-2.15 2.37,2.15, height 5.43
WCAP-ASNP_4X5.5(DXL) [mm]
  rect 2.6x1.6 smd paste+0 mask+0.102: 1(1.8,0) 2(-1.8,0)
  silkscreen extent -2.25,-2.25 2.25,2.25, body extent -2.63,-2.15 2.37,2.15, height 5.38
XCVR_ESP32-S3-WROOM-1U-N4R2 [mm]
  rect 1.5x0.9 smd: 1(-8.75,8.41) 2(-8.75,7.14) 3(-8.75,5.87) 4(-8.75,4.6) 5(-8.75,3.33) 6(-8.75,2.06) 7(-8.75,0.79) 8(-8.75,-0.48) 9(-8.75,-1.75) 10(-8.75,-3.02) 11(-8.75,-4.29) 12(-8.75,-5.56) 13(-8.75,-6.83) 14(-8.75,-8.1) 27(8.75,-8.1) 28(8.75,-6.83) 29(8.75,-5.56) 30(8.75,-4.29) 31(8.75,-3.02) 32(8.75,-1.75) 33(8.75,-0.48) 34(8.75,0.79) 35(8.75,2.06) 36(8.75,3.33) 37(8.75,4.6) 38(8.75,5.87) 39(8.75,7.14) 40(8.75,8.41)
  rect 0.9x1.5 smd: 15(-6.985,-9.35) 16(-5.715,-9.35) 17(-4.445,-9.35) 18(-3.175,-9.35) 19(-1.905,-9.35) 20(-0.635,-9.35) 21(0.635,-9.35) 22(1.905,-9.35) 23(3.175,-9.35) 24(4.445,-9.35) 25(5.715,-9.35) 26(6.985,-9.35)
  rect 0.9x0.9 smd: 41_1(-2.9,2.09) 41_2(-1.5,2.09) 41_3(-0.1,2.09) 41_4(-2.9,0.69) 41_5(-1.5,0.69) 41_6(-0.1,0.69) 41_7(-2.9,-0.71) 41_8(-1.5,-0.71) 41_9(-0.1,-0.71)
  silkscreen extent -10.6,-9.6 9,9.6, body extent -8.98,-9.6 9.02,9.6, height 3.35

## Part data
C1 C2 C3 C4 C5 C6 C7 C8 C9 C10 C11 C12 C13 C14 C15 C16 C17 C18 C19 C20 C21 C22 C23 C24 C25 C26 C27 C29 C31 C32 C34 C37 C38 C39 C40 C41 C42 C44 C45 C46 C47 C48 C49 C50 C51 C52 C53 C54 C55 C56 C57 C58 C59: library part cap_0603_VJ0603D3R9DXCAP, "cap 0603 (1608 Metric)", Package="1608 Vishay Vitramon", Check_prices=https://www.snapeda.com/parts/VJ0603D3R9DXCAP/Vishay/view-part/?ref=eda, MF="Vishay Vitramon", MP=VJ0603D3R9DXCAP, SnapEDA_Link=https://www.snapeda.com/parts/VJ0603D3R9DXCAP/Vishay/view-part/?ref=snap
C28 C33 C43: library part cap_220uF_25V_EEEFTE221XAL, "CAP ALUM 220UF 20% 25V SMD", Package="RADIAL-2 Panasonic", Check_prices=https://www.snapeda.com/parts/EEEFTE221XAL/Panasonic/view-part/?ref=eda, MF=Panasonic, MP=EEEFTE221XAL, SnapEDA_Link=https://www.snapeda.com/parts/EEEFTE221XAL/Panasonic/view-part/?ref=snap
C30: library part CAP_1000uF_50V_EEVFK1H102M, "1000ÂµF 50V Aluminum Electrolytic Capacitors Radial, Can - SMD 5000 Hrs @ 105Â°C", Package="RADIAL-2 Panasonic", Check_prices=https://www.snapeda.com/parts/EEVFK1H102M/Panasonic/view-part/5787261/?ref=eda, Digi-Key_Part_Number=PCE3477CT-ND, MF=Panasonic, MP=EEVFK1H102M, SnapEDA_Link=https://www.snapeda.com/parts/EEVFK1H102M/Panasonic/view-part/5787261/?ref=snap
C35: library part WCAP-ASNP_4X5.5, "CAP ALUM 10UF 20% 16V SMD", Package="Radial WÃ¼rth Elektronik", Check_prices=https://www.snapeda.com/parts/865250340003/W%25C3%25BCrth+Elektronik+Midcom/view-part/?ref=eda, MF="WÃ¼rth Elektronik", MP=865250340003, SnapEDA_Link=https://www.snapeda.com/parts/865250340003/W%25C3%25BCrth+Elektronik+Midcom/view-part/?ref=snap
C36: library part CAP_10uF_25V_WCAP-AS5H_4X5.5, "CAP ALUM 10UF 20% 25V SMD", Package="Radial WÃ¼rth Elektronik", Check_prices=https://www.snapeda.com/parts/865230440002/W%25C3%25BCrth+Elektronik+Midcom/view-part/?ref=eda, MF="WÃ¼rth Elektronik", MP=865230440002, SnapEDA_Link=https://www.snapeda.com/parts/865230440002/W%25C3%25BCrth+Elektronik+Midcom/view-part/?ref=snap
D1 D2 D3 D4 D5 D6 D9 D10 D11: "Diode Schottky 40 V 3A Surface Mount DO-214AC (SMA)", Package="DO-214 Vishay Semiconductor", Check_prices=https://www.snapeda.com/parts/B340A-E3/61T/Vishay/view-part/?ref=eda, MF="Vishay Semiconductor", MP=B340A-E3/61T, SnapEDA_Link=https://www.snapeda.com/parts/B340A-E3/61T/Vishay/view-part/?ref=snap
D7: "Indicator,LED PCB Thru-Hole Bulb 2 mm Red/Yellow/Green Diffused, Tinted Round", Package="D2PAK Dialight", Check_prices=https://www.snapeda.com/parts/570-0100-132F/Dialight/view-part/?ref=eda, MF=Dialight, MP=570-0100-132F, SnapEDA_Link=https://www.snapeda.com/parts/570-0100-132F/Dialight/view-part/?ref=snap
D8: "Yellow 591nm LED Indication - Discrete 2.1V 0603 (1608 Metric)", Package="0603 Lite-On Inc.", Check_prices=https://www.snapeda.com/parts/LTST-C191KSKT/Lite-On/view-part/?ref=eda, MF="Lite-On Inc.", MP=LTST-C191KSKT, SnapEDA_Link=https://www.snapeda.com/parts/LTST-C191KSKT/Lite-On/view-part/?ref=snap
D12 D13 D14: library part SMBJ10CA-13-F, Package=None, Availability=Unavailable, MF="{'manufacturer': u'Diodes Incorporated'}", MP=SMBJ10CA-13-F, Price=None
FL1: library part "ferrite bead 0603", "ferrite bead 0603", Package=None, Availability=Unavailable, MP=BLM18BD421SZ1D, Price=None
FL2: "1 mH @ 1 kHz 2 Line Common Mode Choke Through Hole 700mA DCR 600mOhm", Package="Vertical-4 Kemet", Check_prices=https://www.snapeda.com/parts/SU9V-07010/Kemet/view-part/?ref=eda, MF=Kemet, MP=SU9V-07010, SnapEDA_Link=https://www.snapeda.com/parts/SU9V-07010/Kemet/view-part/?ref=snap
J1 J2: "USB2.0, Type C, Top mount, CH 1.68mm, Dual Row SMT", Package=None, Availability="In Stock", Check_prices=https://www.snapeda.com/parts/12402012E212A/Amphenol/view-part/?ref=eda, MF="Amphenol ICC (Commercial Products)", MP=12402012E212A, Price=None, Purchase-URL=https://pricing.snapeda.com/search/part/12402012E212A/?ref=eda, SnapEDA_Link=https://www.snapeda.com/parts/12402012E212A/Amphenol/view-part/?ref=snap
J3: "1x1 Port Tab-UP Surface Mount RJ45 Connector with Magnetics Module and LEDfor 10/100Base-TX NIC Applications.", Package=Package, Check_prices=https://www.snapeda.com/parts/HR961160C/HanRun/view-part/?ref=eda, MF=HanRun, MP=HR961160C, SnapEDA_Link=https://www.snapeda.com/parts/HR961160C/HanRun/view-part/?ref=snap
J4 J6 J7: "3 Position Terminal Block Header, Male Pins, Shrouded (4 Side) 0.150 (3.81mm) Vertical Through Hole", Package=None, Check_prices=https://www.snapeda.com/parts/395111003/Molex/view-part/?ref=eda, MF=Molex, MP=395111003, SnapEDA_Link=https://www.snapeda.com/parts/395111003/Molex/view-part/?ref=snap
J8: "Micro SD Card Connector, 9 Positions, Connector and Ejector, Push In, Auto Eject Out, Surface Mount, 1.8 mm Height Above Board, Gold Flash", Package=None, Check_prices=https://www.snapeda.com/parts/MSD-1-A/Same+Sky/view-part/?ref=eda, MF="Same Sky", MP=MSD-1-A, SnapEDA_Link=https://www.snapeda.com/parts/MSD-1-A/Same+Sky/view-part/?ref=snap
J11 J12 J13 J14: library part 395111008_terminal_block, "3.81mm Pitch Eurostyle Vertical PCB Header, 8 Circuits", Manufacturer_Name="Molex Connector Corporation", Copyright="Copyright (C) 2025 Ultra Librarian. All rights reserved.", Manufacturer_Part_Number=395111008, RefDes=RefDes, Type=Type
L L1 L2: library part Introdutor_47uH_12x12x7SRR1260-470M, "47ÂµH Shielded Wirewound Inductor 2.6A 86mOhm Max Nonstandard", Package="Nonstandard Bourns", Availability=Unavailable, MF=Bourns, MP=SRR1260-470M, Price=None, SnapEDA_Link=https://www.snapeda.com/parts/SRR1260-470M/Bourns/view-part/283129/?ref=snap
P1 P2: "Header, 2-Pin", LatestRevisionDate=17-Jul-2002, LatestRevisionNote="Re-released for DXP Platform.", Publisher="Altium Limited"
Q1 Q2 Q3 Q4 Q5 Q6: "BJT, SOT-23, 40V, 200mA, NPN, 0.35W, 150Â°C", Package="SOT-23 Diotec", Check_prices=https://www.snapeda.com/parts/MMBT3904/Diotec/view-part/?ref=eda, MF="Diotec Semiconductor", MP=MMBT3904, SnapEDA_Link=https://www.snapeda.com/parts/MMBT3904/Diotec/view-part/?ref=snap
R1 R2 R3 R4 R5 R6 R7 R8 R9 R10 R11 R12 R13 R14 R15 R16 R17 R18 R19 R20 R21 R22 R23 R24 R25 R26 R27 R28 R29 R30 R31 R32 R33 R34 R35 R36 R37 R38 R39 R40 R41 R42 R43 R44 R45 R46 R47 R48 R49 R50 R51 R52 R53 R54 R55 R56 R57 R58 R59 R60 R61 R62 R63 R64 R65 R66 R67 R68 R69 R70 R71 R72 R73 R76 R77: library part res_0603_ERJU03J474V, "0603 Anti-Sulfurated", Package="1608-2 Panasonic", Check_prices=https://www.snapeda.com/parts/ERJU03J474V/Panasonic/view-part/?ref=eda, MF=Panasonic, MP=ERJU03J474V, SnapEDA_Link=https://www.snapeda.com/parts/ERJU03J474V/Panasonic/view-part/?ref=snap
U1: "1A LOW DROPOUT VOLTAGE REGULATOR SOT-223", Package="SOT-223 Seeed Technology", Check_prices=https://www.snapeda.com/parts/AMS1117/Advanced+Monolithic+Systems/view-part/?ref=eda, MF="Advanced Monolithic Systems", MP=AMS1117, SnapEDA_Link=https://www.snapeda.com/parts/AMS1117/Advanced+Monolithic+Systems/view-part/?ref=snap
U2 U5 U7: "17V Clamp 5A (8/20Âµs) Ipp Tvs Diode Surface Mount SOT-23-6", Package="SOT-23-6 STMicroelectronics", Availability="In Stock", Check_prices=https://www.snapeda.com/parts/USBLC6-2SC6/STMicroelectronics/view-part/?ref=eda, MF=STMicroelectronics, MP=USBLC6-2SC6, Price=None, Purchase-URL=https://pricing.snapeda.com/search/part/USBLC6-2SC6/?ref=eda, SnapEDA_Link=https://www.snapeda.com/parts/USBLC6-2SC6/STMicroelectronics/view-part/?ref=snap
U3: Package=None, Availability=Unavailable, MF="{'manufacturer': u'Espressif Systems'}", MP=ESP32-S3-WROOM-1U-N4R2, Price=None
U4: "USB to serial chip CH340", Package=None, Availability="Not in stock", Check_prices=https://www.snapeda.com/parts/CH340C/WCH/view-part/?ref=eda, MF=WCH, MP=CH340C, Price=None, SnapEDA_Link=https://www.snapeda.com/parts/CH340C/WCH/view-part/?ref=snap
U6: "Hardwired TCP/IP embedded Ethernet controller", Package=None, Availability=Unavailable, MP=W5500, Price=None
U8 VR1: "SIMPLE SWITCHERÂ® 4.5V to 40V, 3A Low Component Count Step-Down Regulator", Package="TO-263-5 Texas Instruments", MF="Texas Instruments"
  U8: Check_prices=https://www.snapeda.com/parts/LM2596S-12/NOPB/Texas+Instruments/view-part/?ref=eda, MP=LM2596S-12/NOPB, SnapEDA_Link=https://www.snapeda.com/parts/LM2596S-12/NOPB/Texas+Instruments/view-part/?ref=snap
  VR1: Check_prices=https://www.snapeda.com/parts/LM2596S-5.0/NOPB/Texas+Instruments/view-part/?ref=eda, MP=LM2596S-5.0/NOPB, SnapEDA_Link=https://www.snapeda.com/parts/LM2596S-5.0/NOPB/Texas+Instruments/view-part/?ref=snap
U9: "Linear Voltage Regulator IC Positive Fixed 1 Output 3A D2PAK", Package="TO-263-3 STMicroelectronics", Check_prices=https://www.snapeda.com/parts/LD1085D2T33R/STMicroelectronics/view-part/?ref=eda, MF=STMicroelectronics, MP=LD1085D2T33R, SnapEDA_Link=https://www.snapeda.com/parts/LD1085D2T33R/STMicroelectronics/view-part/?ref=snap
U10: "Buck Switching Regulator IC Positive Adjustable 1.2V 1 Output 3A TO-263-6, DÂ²Pak (5 Leads + Tab), TO-263BA", Package=None, Check_prices=https://www.snapeda.com/parts/LM2596S-ADJ/Umwelt+Sensor+Teknik/view-part/?ref=eda, MF=UMW, MP=LM2596S-ADJ, SnapEDA_Link=https://www.snapeda.com/parts/LM2596S-ADJ/Umwelt+Sensor+Teknik/view-part/?ref=snap
U11: "Wireless serial port module (UART)", Package=Package, Availability="Not in stock", Check_prices=https://www.snapeda.com/parts/E32-433T20S/EBYTE/view-part/?ref=eda, MF=EBYTE, MP=E32-433T20S, Price=None, SnapEDA_Link=https://www.snapeda.com/parts/E32-433T20S/EBYTE/view-part/?ref=snap
U12: "8-BIT INPUT/OUTPUT EXPANDER, I2C INTERFACE", Package="SOIC-18 Microchip", Check_prices=https://www.snapeda.com/parts/MCP23008-E/SO/Microchip+Technology/view-part/?ref=eda, MF=Microchip, MP=MCP23008-E/SO, SnapEDA_Link=https://www.snapeda.com/parts/MCP23008-E/SO/Microchip+Technology/view-part/?ref=snap
U13: "2 Circuit IC Switch 4:1 130Ohm 16-SOIC", Package="SOIC-16 NXP Semiconductors", Check_prices=https://www.snapeda.com/parts/74HC4052D/Toshiba/view-part/?ref=eda, MF=Toshiba, MP=74HC4052D, SnapEDA_Link=https://www.snapeda.com/parts/74HC4052D/Toshiba/view-part/?ref=snap
U14: "12-bit, 3.3-kSPS, 4-channel, delta-sigma ADC with PGA, oscillator, VREF, comparator and I2C", Package="VSSOP-10 Texas Instruments", Check_prices=https://www.snapeda.com/parts/ADS1015IDGSR/Texas+Instruments/view-part/?ref=eda, MF="Texas Instruments", MP=ADS1015IDGSR, SnapEDA_Link=https://www.snapeda.com/parts/ADS1015IDGSR/Texas+Instruments/view-part/?ref=snap
U15: "3.3V Powered, 10Mbps and Slew-Rate Limited, True RS-485/RS-422 Transceivers", Package="SOIC-8 Maxim", Check_prices=https://www.snapeda.com/parts/MAX3485ESA+/Analog+Devices/view-part/?ref=eda, MF="Analog Devices", MP=MAX3485ESA+, SnapEDA_Link=https://www.snapeda.com/parts/MAX3485ESA+/Analog+Devices/view-part/?ref=snap
Y1: "25 MHz XO (Standard) HCMOS Oscillator 1.6V ~ 3.6V Enable/Disable 4-SMD, No Lead", Package="ECS-2520MV-0-4 ECS", Check_prices=https://www.snapeda.com/parts/ECS-2520MV-250-BN-TR/ECS/view-part/?ref=eda, MF="ECS Inc.", MP=ECS-2520MV-250-BN-TR, SnapEDA_Link=https://www.snapeda.com/parts/ECS-2520MV-250-BN-TR/ECS/view-part/?ref=snap
BOOT RESET: Ma_Hang=MH001036, Ten="Nút Nhấn 2 Chân 3x6x2.5MM SMD"

## Free pads (board coordinates)
  rrect50% 4x8 hole 3 slot 6 at 90 deg mask+0.102: 4(4.318,12.827) 4(4.318,86.233) 4(171.196,12.827) 4(171.196,86.233)
  round 0.6 hole 0.3 mask+0.102: 6(2.235,20.125) 6(2.235,23.569) 6(2.235,27.013) 6(2.235,30.457) 6(2.235,33.9) 6(2.235,37.344) 6(2.235,40.788) 6(2.235,44.232) 6(2.235,47.676) 6(2.235,51.12) 6(2.235,54.564) 6(2.235,58.008) 6(2.235,61.452) 6(2.235,64.896) 6(2.235,68.34) 6(2.235,71.784) 6(2.235,75.228) 6(2.235,78.672) 6(4.953,18.288) 6(4.953,20.193) 6(5.207,21.59) 6(5.207,22.987) 6(5.207,25.019) 6(5.207,26.543) 6(6.35,18.288) 6(6.35,20.193) 6(6.35,37.165) 6(6.35,38.481) 6(6.35,39.78) 6(6.35,41.096) 6(6.477,30.688) 6(6.477,32.004) 6(6.477,33.863) 6(6.477,35.179) 6(8.001,14.605) 6(8.128,33.863) 6(8.128,35.179) 6(8.128,37.165) 6(8.128,38.481) 6(8.133,39.855) 6(8.133,41.171) 6(8.255,30.688) 6(8.255,32.004) 6(9.398,25.019) 6(9.398,26.289) 6(9.652,33.863) 6(9.652,35.179) 6(9.652,37.165) 6(9.652,38.481) 6(9.657,39.855) 6(9.657,41.171) 6(9.779,30.688) 6(9.779,32.004) 6(10.779,25.013) 6(10.795,26.289) 6(11.557,37.165) 6(11.557,38.481) 6(11.684,30.815) 6(11.684,32.131) 6(11.684,33.99) 6(11.684,35.306) 6(11.811,9.017) 6(12.065,26.289) 6(12.085,25.034) 6(13.081,37.165) 6(13.081,38.481) 6(13.208,30.815) 6(13.208,32.131) 6(13.208,33.99) 6(13.208,35.306) 6(15.091,16.221) 6(15.111,17.552) 6(16.234,16.221) 6(16.256,17.562) 6(17.145,9.017) 6(19.638,28.874) 6(19.638,30.19) 6(21.332,27.467) 6(21.332,28.783) 6(22.237,23.058) 6(22.237,24.374) 6(22.856,27.467) 6(22.856,28.783) 6(24.97,4.187) 6(24.97,5.503) 6(26.494,4.187) 6(26.494,5.503) 6(29.001,28.241) 6(29.161,4.187) 6(29.161,5.503) 6(30.317,28.241) 6(30.349,30.388) 6(30.349,31.704) 6(30.433,22.27) 6(30.433,23.586) 6(30.476,24.927) 6(30.476,26.243) 6(30.685,4.187) 6(30.685,5.503) 6(31.873,30.388) 6(31.873,31.704) 6(32,24.927) 6(32,26.243) 6(33.86,11.045) 6(33.86,12.361) 6(35.384,11.045) 6(35.384,12.361) 6(38.305,6.092) 6(38.305,7.408) 6(38.559,11.045) 6(38.559,12.361) 6(39.829,6.092) 6(39.829,7.408) 6(40.083,11.045) 6(40.083,12.361) 6(43.688,72.644) 6(45.339,17.145) 6(45.466,72.644) 6(45.593,70.485) 6(45.998,42.391) 6(45.998,43.707) 6(46.022,39.69) 6(46.022,41.006) 6(46.041,52.71) 6(46.05,54.606) 6(47.32,55.876) 6(47.406,53.902) 6(47.522,42.391) 6(47.522,43.707) 6(47.522,45.121) 6(47.546,39.69) 6(47.546,41.006) 6(48.59,57.146) 6(48.641,55.245) 6(49.046,42.391) 6(49.046,43.707) 6(49.046,45.121) 6(49.07,39.69) 6(49.07,41.006) 6(49.579,70.655) 6(49.579,72.687) 6(49.898,56.502) 6(50.697,42.391) 6(50.697,43.707) 6(50.697,45.121) 6(50.721,39.69) 6(50.721,41.006) 6(51.965,52.532) 6(52.299,42.391) 6(52.299,43.707) 6(52.299,45.121) 6(52.323,39.69) 6(52.323,41.006) 6(52.627,70.782) 6(52.627,72.687) 6(53.644,52.532) 6(53.644,53.848) 6(54.148,42.391) 6(54.148,43.707) 6(54.148,45.121) 6(54.172,39.69) 6(54.172,41.006) 6(55.01,52.532) 6(55.01,53.848) 6(55.01,55.262) 6(55.672,42.391) 6(55.672,43.707) 6(55.672,45.121) 6(55.696,39.69) 6(55.696,41.006) 6(56.368,29.611) 6(56.388,28.702) 6(56.388,30.533) 6(56.438,52.532) 6(56.438,53.848) 6(56.438,55.262) 6(56.438,56.643) 6(57.196,42.391) 6(57.196,43.707) 6(57.196,45.121) 6(57.22,39.69) 6(57.22,41.006) 6(57.506,30.533) 6(57.508,29.628) 6(57.531,28.702) 6(57.962,52.532) 6(57.962,53.848) 6(57.962,55.262) 6(57.962,56.643) 6(58.028,58.185) 6(58.674,28.702) 6(58.847,42.391) 6(58.847,43.707) 6(58.847,45.121) 6(58.871,39.69) 6(58.871,41.006) 6(59.486,52.532) 6(59.486,53.848) 6(59.486,55.262) 6(59.486,56.643) 6(59.552,58.185) 6(59.563,59.619) 6(60.448,42.391) 6(60.448,43.707) 6(60.448,45.121) 6(60.473,39.69) 6(60.473,41.006) 6(61.137,52.532) 6(61.137,53.848) 6(61.137,55.262) 6(61.137,56.643) 6(61.137,58.185) 6(61.137,59.619) 6(62.226,42.391) 6(62.23,43.688) 6(62.23,45.102) 6(62.25,41.006) 6(62.738,52.532) 6(62.738,53.848) 6(62.738,55.262) 6(62.738,56.643) 6(62.738,58.185) 6(62.738,59.619) 6(63.831,43.688) 6(63.831,45.102) 6(63.86,42.372) 6(65.507,43.663) 6(65.507,45.06) 6(67.163,20.65) 6(67.163,21.991) 6(67.285,45.06) 6(68.396,20.65) 6(68.396,21.991) 6(69.552,20.65) 6(69.552,21.991) 6(70.153,35.603) 6(70.859,20.65) 6(70.859,21.991) 6(71.931,35.603) 6(73.425,35.593) 6(75.142,35.593) 6(76.627,35.61) 6(78.105,28.321) 6(78.151,35.61) 6(78.994,28.321) 6(79.675,35.61) 6(81.326,35.61) 6(82.927,35.61) 6(84.776,35.61) 6(86.3,35.61) 6(87.824,35.61) 6(89.475,35.61) 6(91.077,35.61) 6(92.759,35.603) 6(94.537,35.603) 6(96.442,35.603) 6(98.347,35.603) 6(100.33,16.129) 6(106.172,46.491) 6(106.172,48.768) 6(106.172,51.059) 6(106.172,53.522) 6(106.188,44.193) 6(106.647,16.129) 6(109.492,44.201) 6(109.492,46.491) 6(109.492,48.768) 6(109.492,51.059) 6(109.492,53.472) 6(112.614,44.201) 6(112.614,46.491) 6(112.614,48.768) 6(112.614,51.059) 6(112.614,53.472) 6(116.096,44.201) 6(116.096,46.491) 6(116.096,48.768) 6(116.096,51.059) 6(116.096,53.472) 6(116.967,94.488) 6(117.031,83.99) 6(117.031,85.503) 6(117.031,86.946) 6(117.031,88.332) 6(117.056,90.658) 6(118.809,83.99) 6(118.809,85.503) 6(118.809,86.946) 6(118.809,88.332) 6(119.507,94.488) 6(119.596,90.658) 6(119.649,44.201) 6(119.649,46.491) 6(119.649,48.768) 6(119.649,51.059) 6(119.649,53.472) 6(120.206,83.99) 6(120.206,85.503) 6(120.206,86.946) 6(120.206,88.332) 6(120.744,18.415) 6(120.777,1.905) 6(120.777,3.302) 6(120.777,11.811) 6(120.777,13.081) 6(120.777,14.478) 6(120.777,20.066) 6(120.777,21.717) 6(120.777,23.368) 6(121.73,83.99) 6(121.73,85.503) 6(121.73,86.946) 6(121.73,88.332) 6(121.883,3.339) 6(121.92,1.905) 6(121.92,11.811) 6(121.92,13.081) 6(121.92,14.478) 6(122.301,94.488) 6(122.39,90.658) 6(122.5,44.201) 6(122.5,46.491) 6(122.5,48.768) 6(122.5,51.059) 6(122.5,53.522) 6(122.936,1.905) 6(122.936,3.302) 6(123.063,11.811) 6(123.063,13.081) 6(123.063,14.478) 6(123.127,83.99) 6(123.127,85.503) 6(123.127,86.946) 6(123.127,88.332) 6(124.524,83.99) 6(124.524,85.503) 6(124.524,86.946) 6(124.524,88.332) 6(124.968,94.488) 6(125.057,90.658) 6(125.603,11.445) 6(125.603,13.462) 6(125.603,15.494) 6(125.603,17.655) 6(125.603,20.193) 6(125.921,83.99) 6(125.921,85.503) 6(125.921,86.946) 6(125.921,88.332) 6(127.191,83.99) 6(127.191,85.503) 6(127.191,86.946) 6(127.191,88.332) 6(127.254,94.488) 6(127.343,90.658) 6(128.27,11.445) 6(128.27,13.462) 6(128.27,15.494) 6(128.27,17.655) 6(128.27,20.193) 6(129.453,83.99) 6(129.453,85.503) 6(129.453,86.946) 6(129.453,88.332) 6(129.54,94.488) 6(129.629,90.658) 6(130.556,11.445) 6(130.556,13.462) 6(130.556,15.494) 6(130.556,17.655) 6(130.556,20.193) 6(131.053,83.99) 6(131.053,85.503) 6(131.053,86.946) 6(131.053,88.332) 6(131.826,94.488) 6(131.915,90.658) 6(132.577,83.99) 6(132.577,85.503) 6(132.577,86.946) 6(132.577,88.332) 6(132.842,11.445) 6(132.842,13.462) 6(132.842,15.494) 6(132.842,17.655) 6(132.842,20.193) 6(133.993,83.99) 6(133.993,85.503) 6(133.993,86.946) 6(133.993,88.332) 6(134.366,94.488) 6(134.455,90.658) 6(135.498,83.99) 6(135.498,85.503) 6(135.498,86.946) 6(135.498,88.332) 6(137.287,94.488) 6(137.376,90.658) 6(167.513,81.205) 6(167.513,83.738) 6(167.513,86.271) 6(167.513,88.804) 6(167.513,91.337) 6(168.021,8.128) 6(168.021,10.261) 6(168.021,12.395) 6(168.021,14.528) 6(168.021,16.661)
  round 1.524 hole 0.762 paste+0 mask+0.102: 7(78.994,51.308) 7(78.994,54.165) 7(78.994,57.023)

## Via types
v1: diameter 0.6, hole 0.3, Top Layer to Bottom Layer, tented both sides, 195 vias
v2: diameter 1.524, hole 0.762, Top Layer to Bottom Layer, tented both sides, 1 vias

## Nets (pads, with @x,y where several pads share a name; then routed paths per layer and width w, separated by ;. In a path a pad name is that pad's centre, name@x,y a point inside that pad or via, vN(x,y) a via of type N, cw(c..) or ccw(c..) an arc to the next point about the centre after c; other vN are vias at no path point)
1V21: C23.1 U6.22 | length 3.9
  Top Layer w0.254: C23.1@12.319,48.174 13.249,48.174 14.534,49.459 15.619,49.459 U6.22@15.632,49.472
1Z: U3.11 U13.13 | length 50.7
  Top Layer w0.254: U3.11@30.988,17.272 v1(30.988,21.082) ; v1(64.356,31.577) 64.356,31.483 64.516,31.324 U13.13@64.516,28.499
  Bottom Layer w0.254: v1(30.988,21.082) 47.752,21.082 50.419,23.749 50.419,30.861 53.34,33.782 62.254,33.782 63.836,32.2 63.836,32.097 v1(64.356,31.577)
2Z: U3.10 U13.3 | length 54.1
  Top Layer w0.254: U3.10@29.718,17.272 v1(29.718,20.366) ; v1(62.865,26.162) 62.865,26.068 63.246,25.687 U13.3@63.246,23.317
  Bottom Layer w0.254: v1(29.718,20.366) 48.052,20.366 51.435,23.749 51.435,30.988 53.44,32.993 60.479,32.993 62.738,30.734 62.738,26.484 62.799,26.423 62.799,26.228 v1(62.865,26.162)
+3.3: C3.2 C4.2 C10.2 C11.2 U1.2 U3.2 | length 6.7
  Top Layer w0.254: U1.2@8.593,20.32 U1.2@15.283,20.32
+3.3A: C13.1 C14.1 C15.1 C16.1 C17.1 C18.1 C19.1 FL1.2 U6.4 U6.8 U6.11 U6.15 U6.17 U6.21 | length 14.4
  Top Layer w0.254: U6.21@15.632,49.972 17.075,49.972 17.278,50.175 v1(17.371,50.175) ; U6.17@15.632,51.972 17.301,51.972 v1(17.371,51.902) ; U6.11@17.562,55.402 17.562,53.616 17.784,53.394 18.656,53.394 19.143,53.882 ; 19.05,53.87 19.05,55.39 U6.8@19.062,55.402 ; 19.143,53.882 19.558,53.467 20.828,53.467 21.062,53.701 U6.4@21.062,55.402
  Bottom Layer w0.254: v1(17.371,50.175) v1(17.371,51.902)
+3V3: C12.1 C20.1 C26.1 C35.1 C38.2 C39.2 C44.2 C51.2 C52.2 C53.2 C54.2 FL1.1 J8.4 J12.2 J13.4 pad.6@45.339,17.145 pad.6@100.33,16.129 pad.6@106.647,16.129 pad.7 R3.2 R10.2 R11.1 R12.1 R15.1 R17.1 R18.1 R19.1 R20.1 R28.2 R29.2 R30.2 R31.2 R38.2 R39.2 R40.2 R41.2 R42.2 R43.2 R44.2 R46.2 R47.2 R61.1 R62.1 R63.1 R64.1 R65.1 R67.2 R71.1 R72.1 R73.1 R76.1 R77.1 U6.28 U9.3 U12.18 U13.16 U15.8 Y1.1 Y1.4 | length 44.9
  Top Layer w0.254: v1(21.717,63.119) 21.754,63.082 21.754,61.8 R10.2@21.791,61.763 ; R15.1@22.987,42.713 23.868,42.713 24.163,42.418 v1(24.257,42.418) ; R3.2@26.215,61.763 26.252,61.8 26.252,63.082 v1(26.289,63.119) ; R17.1@28.247,52.238 28.288,52.197 v1(30.099,52.197) ; v1(54.356,74.803) v1@54.374,74.821 ; v1@106.934,27.94 106.934,22.882 107.083,22.733 R42.2@109.093,22.733 ; C39.2@121.031,26.416 121.031,27.559 121.856,28.384 v1(122.555,28.384) ; v1@129.54,74.549 v1(129.794,74.549)
  Bottom Layer w0.254: v1@16.285,38.305 16.461,38.481 v1(16.51,38.481) ; v1(24.257,42.418) 27.156,42.418 27.305,42.567 27.305,52.048 27.454,52.197 v1(30.099,52.197) ; 121.92,40.513 121.92,40.419 121.666,40.165 121.666,29.273 v1(122.555,28.384)
  other v1: 106.934,28.194 122.428,40.513 108.839,70.993 95.885,71.12 151.13,73.914 30.226,74.93 53.594,80.772
+5: C1.2 C2.2 C28.1 C32.2 C36.1 C37.2 C45.2 C46.2 C55.2 C56.2 C57.2 C58.2 C59.2 D1.C D2.C D9.C D10.C D11.C J4.2 J12.3 L1.1 pad.6@8.001,14.605 R53.2 R54.2 U1.3 U9.2 U11.25 U14.8 VR1.4 | length 38.8
  Top Layer w0.254: D2.C@42.291,78.834 45.146,78.834 v1(45.186,78.874)
  Bottom Layer w0.254: v1(103.886,28.702) 103.886,43.862 103.759,43.989 103.759,59.055 104.013,59.309 108.285,59.309 108.473,59.497 v1(109.027,59.497)
  other v1: 82.169,21.463 90.805,21.463 102.743,21.463 66.04,64.897 136.144,71.501 62.865,82.931
+9: C33.1 C41.2 C42.2 J4.1 L2.1 R36.2
+12: C29.2 C34.2 C40.2 C43.1 J6.2 L.1 U8.4 U10.1 VR1.1 | length 24.5
  Top Layer w0.254: VR1.1@141.02,60.481 141.049,60.452 v1(144.145,60.452) ; v1@142.984,39.769 v1(143.002,39.751)
  Bottom Layer w0.254: v1(143.002,39.751) 143.002,59.563 143.825,60.386 144.079,60.386 v1(144.145,60.452)
+24: C30.1 C31.2 FL2.3 J6.3 U8.1
A11: C50.2 J14.1 R60.1 U14.5 | length 26.5
  Top Layer w0.254: U14.5@79.112,72.501 78.517,72.501 77.47,73.548 77.47,76.965 79.118,78.613 C50.2@79.133,78.613 78.941,78.805 R60.1@78.941,80.264 78.941,92.403 J14.1@82.296,95.758
A12: C49.2 J14.2 R59.1 U14.4 | length 31.1
  Top Layer w0.254: U14.4@79.112,72.001 80.764,72.001 81.153,72.39 81.153,73.003 80.877,73.279 80.164,73.279 79.148,74.295 C49.2@79.133,74.295 78.994,74.434 R59.1@78.994,75.946 78.994,76.835 79.502,77.343 81.661,77.343 82.147,77.829 82.147,91.799 J14.2@86.106,95.758
A13: J12.8 R56.1 | length 16.7
  Top Layer w0.254: R56.1@74.676,79.719 74.676,94.234 J12.8@76.2,95.758
A14: J12.7 R55.1 | length 16.8
  Top Layer w0.254: R55.1@70.612,79.682 70.612,93.98 J12.7@72.39,95.758